# Altium PCB PCB_sheet.PcbDoc
Units mm, origin at the board's own origin, x right, y up, seen from the top; angles counter-clockwise.
Board outline 87.12 x 86.74 mm, 2 copper layers (Top Layer, Bottom Layer); 7 components, 18 nets, 106 pads, 29 vias.
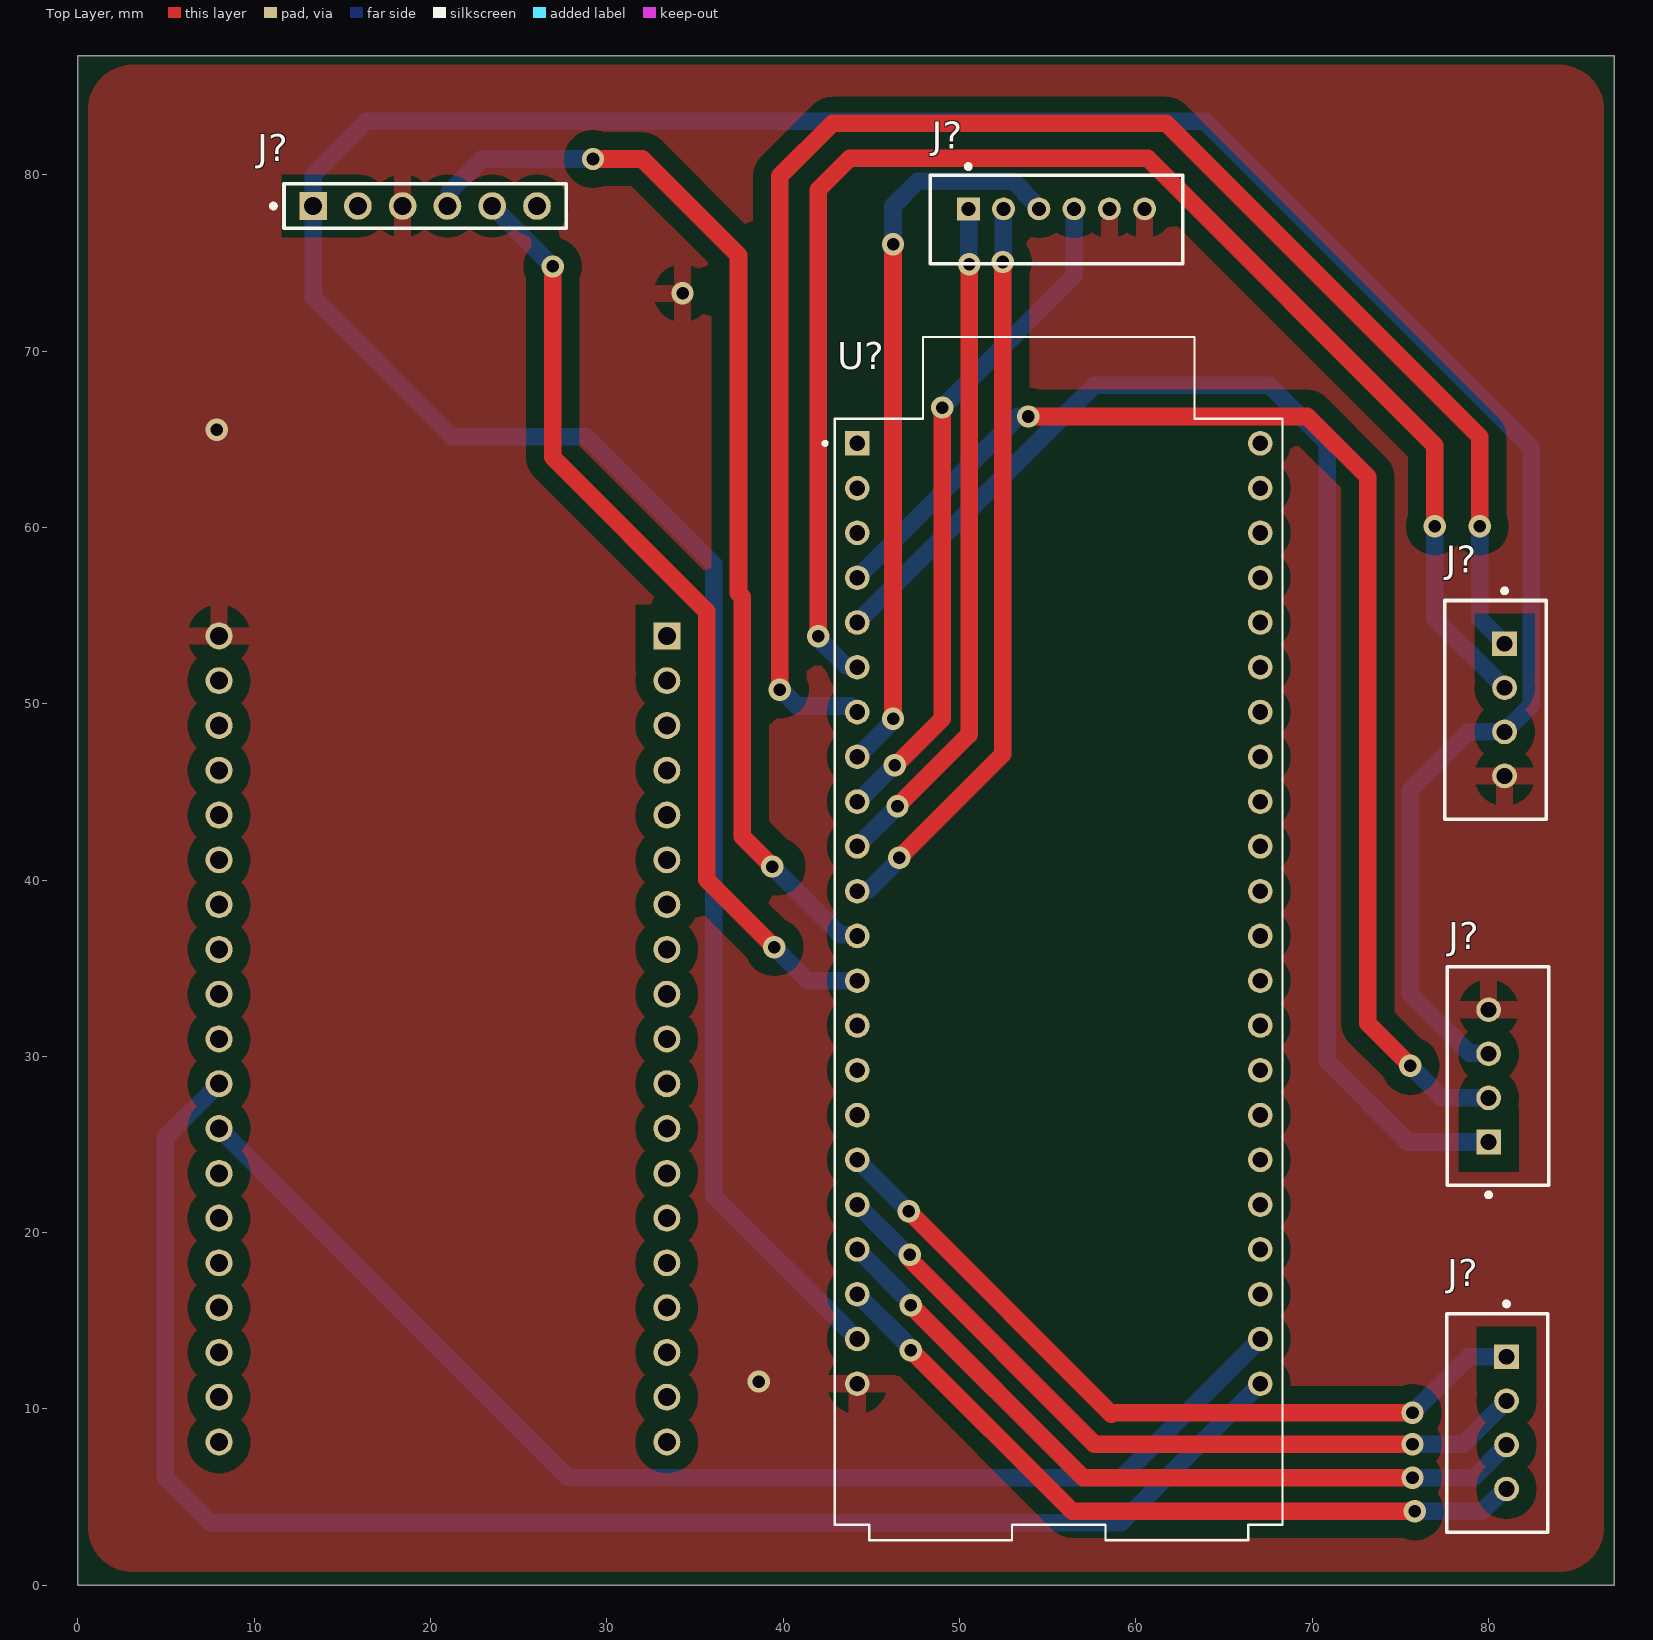
[diagram p0: Top Layer view]
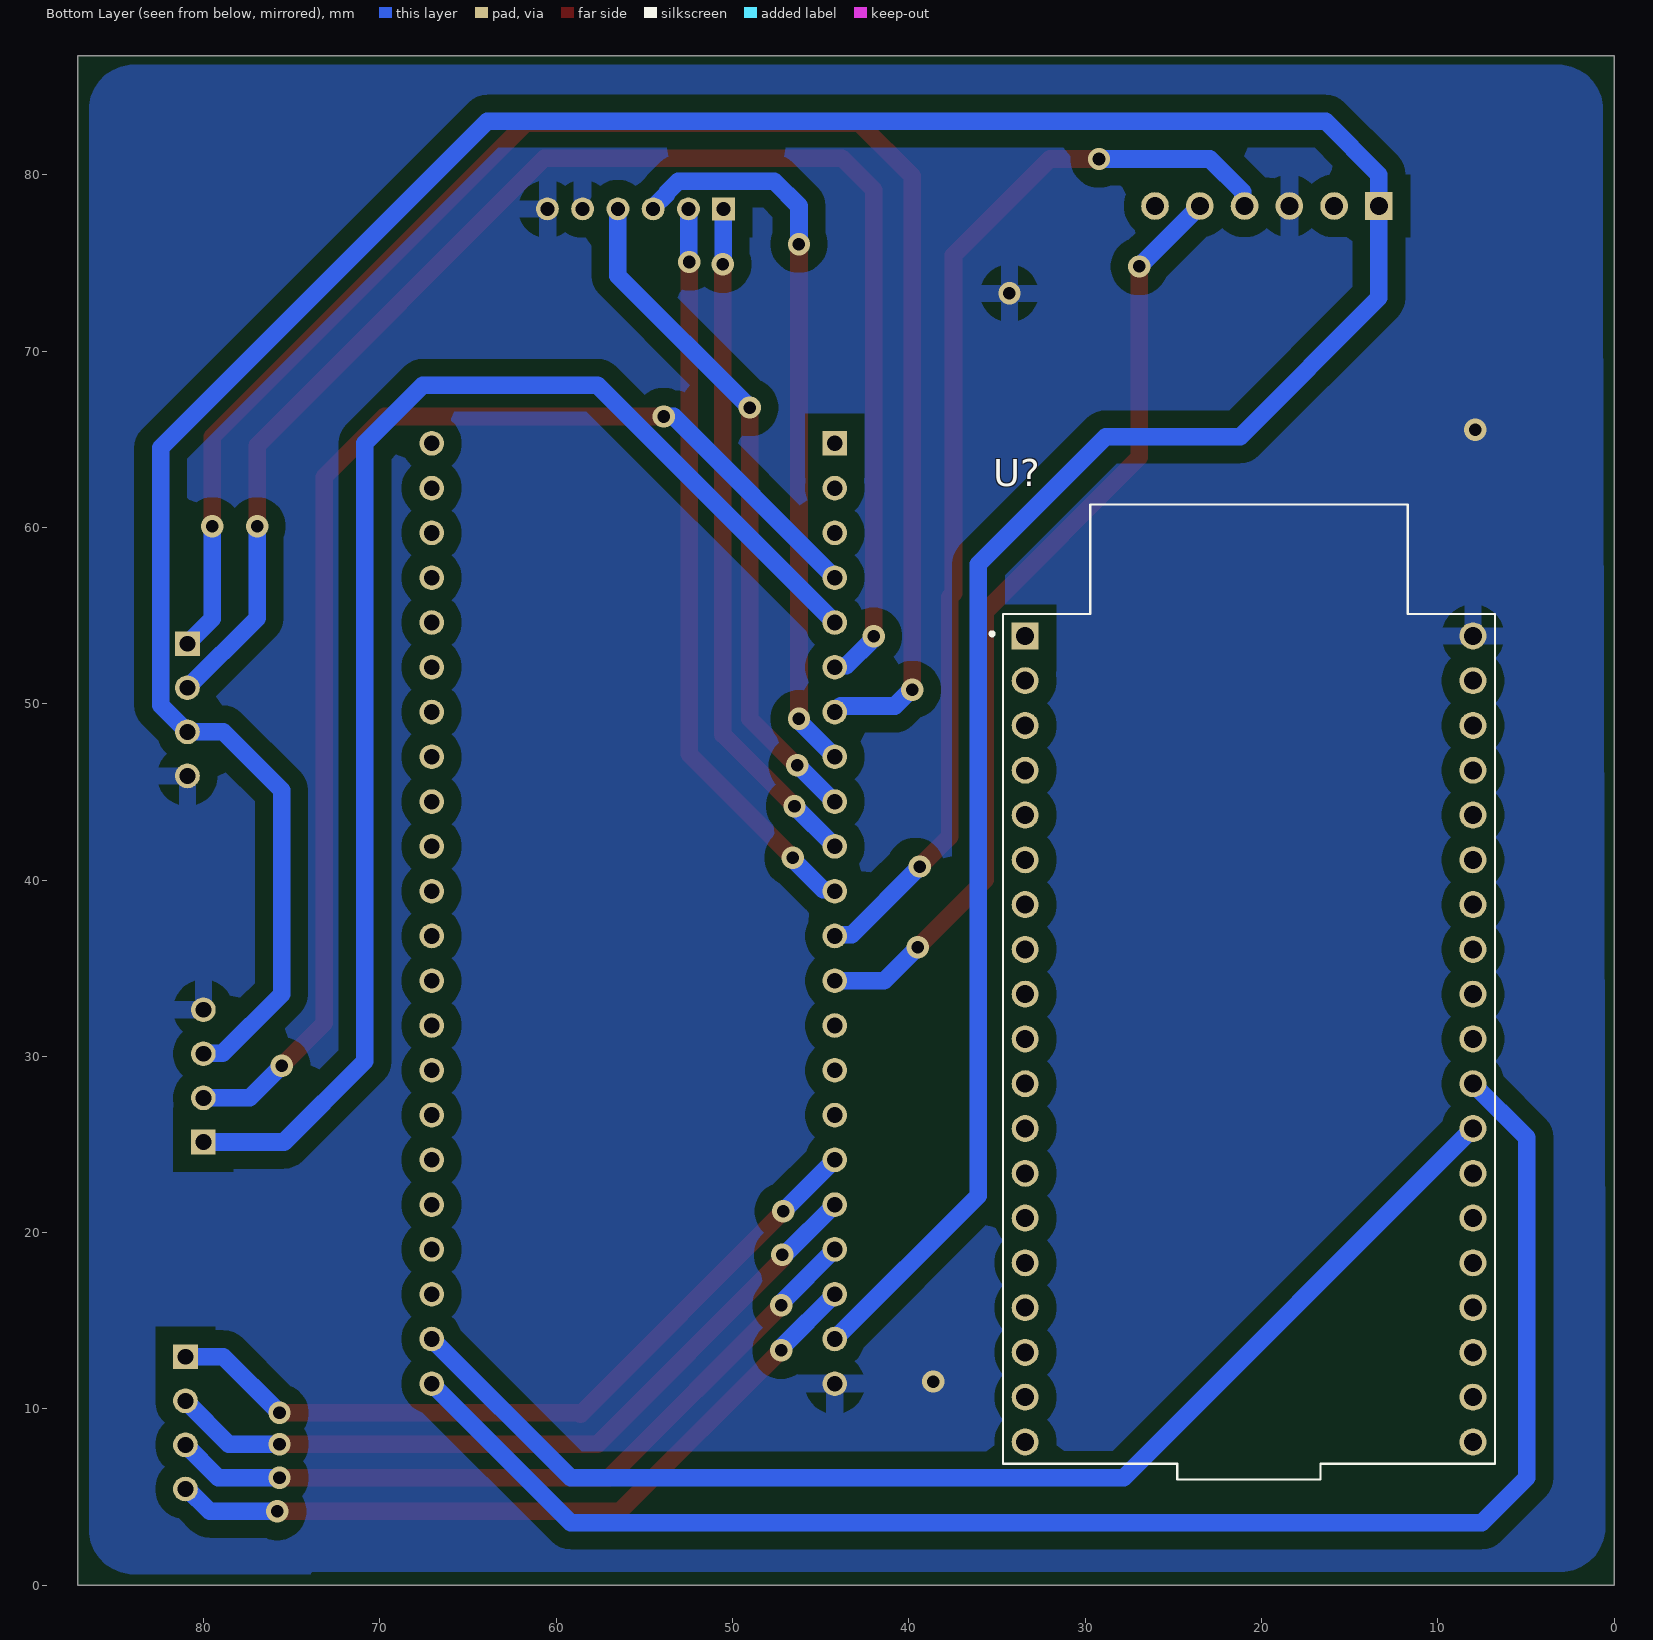
[diagram p1: Bottom Layer view, seen from below]
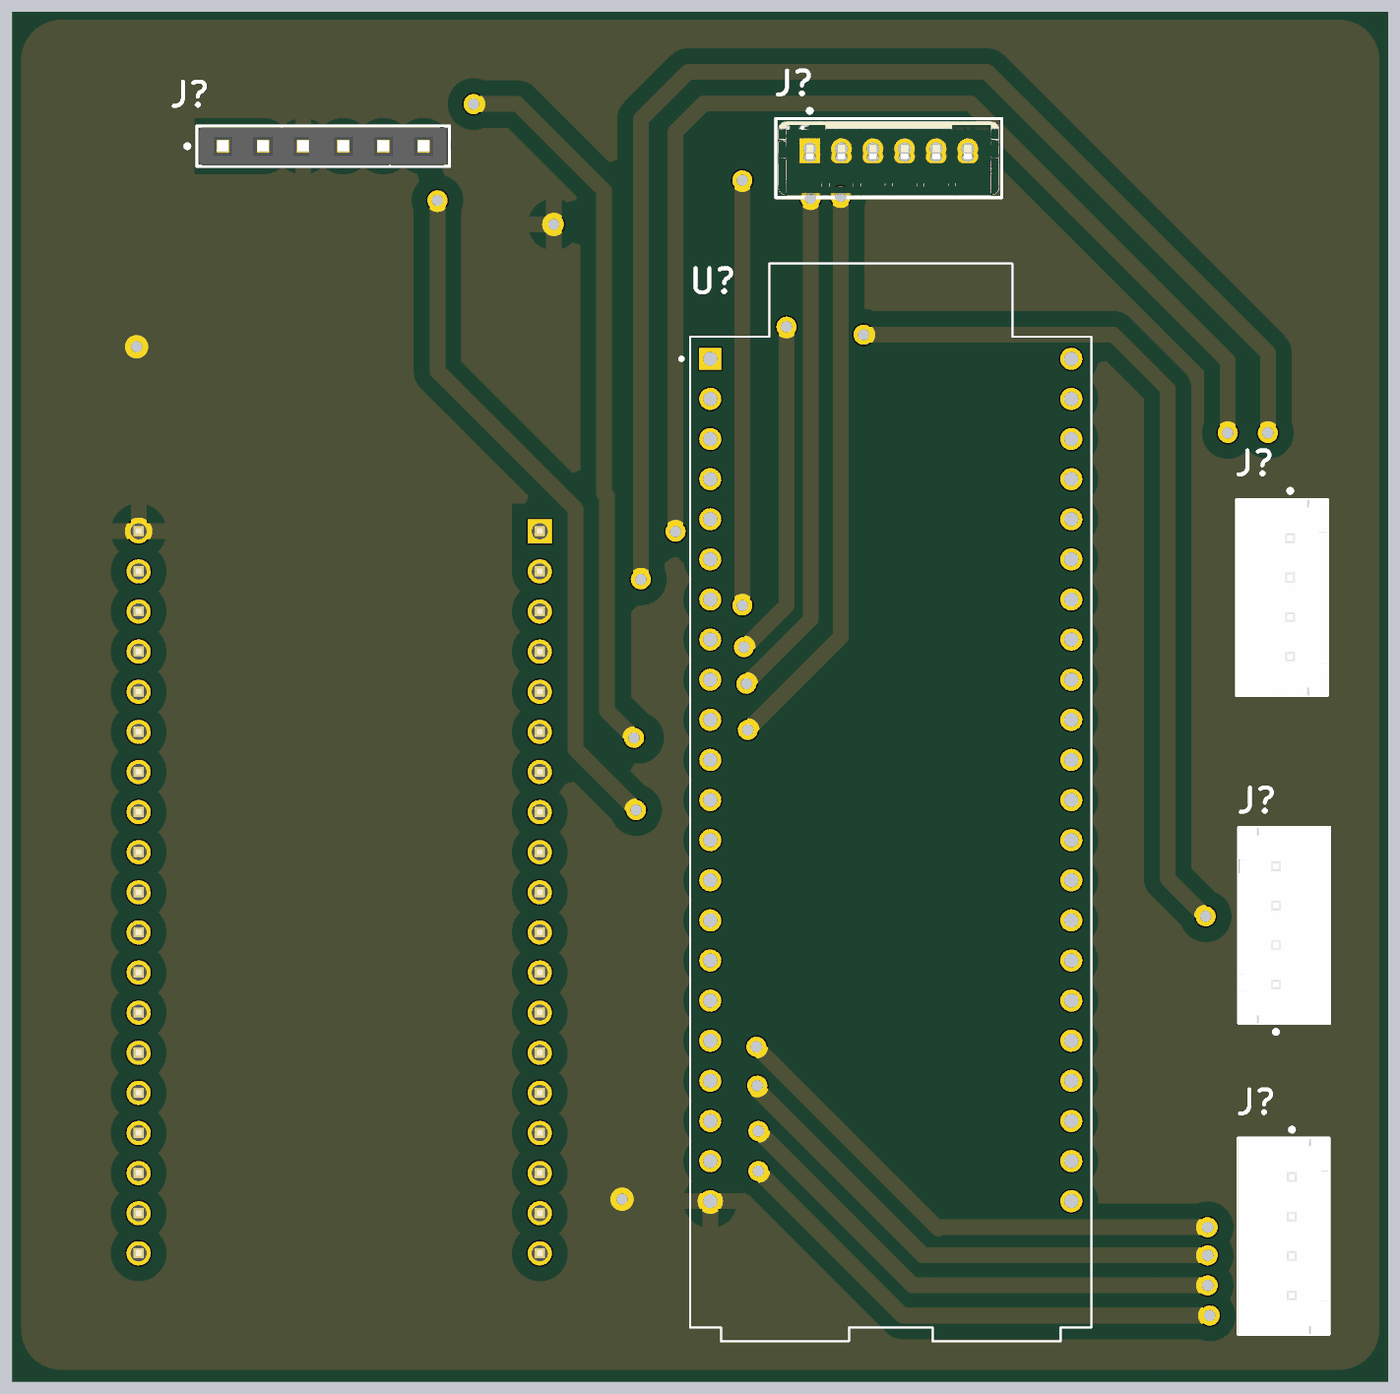
[diagram p2: 3D render of the assembled board from above, using the file's embedded part models]

## Layer stack, top to bottom
Top Solder: solder mask 0.0102, Solder Resist, Dk 3.5
Top Layer: signal copper 0.0356
Dielectric 1: dielectric 0.32, FR-4, Dk 4.8
Bottom Layer: signal copper 0.0356
Bottom Solder: solder mask 0.0102, Solder Resist, Dk 3.5

## Board outline
0,0.381 0,86.741 87.122,86.741 87.122,0 0,0

## Design rules (kind name [scope] priority, off if disabled: settings)
Clearance [All] p1: gap=1 ignorepadtopadclearanceinfootprint=FALSE
PlaneClearance [All] p1: clearance=1
PlaneConnect [All] p1: planeconnectstyle=Relief reliefexpansion=1 reliefentries=4 reliefconductorwidth=1 reliefairgap=1
PolygonConnect [All] p1: connectstyle=Relief reliefconductorwidth=1 reliefentries=4 polygonreliefangle="90 Angle" airgapwidth=1
RoutingVias [All] p1: holewidth=0.711 width=1.27 viastyle="Through Hole" minholewidth=0.711 minwidth=1.27 maxholewidth=0.711 maxwidth=1.27
SolderMaskExpansion [All] p1: expansion=0.102 istentingtop=FALSE
SupplyNets "Schematic Supply Nets_1" [InNet('GND')] p1: voltage=0.000
SupplyNets "Schematic Supply Nets" [InNet('VCC')] p2: voltage=0.000
Width [All] p1: maxlimit=1.5 minlimit=0.5 preferedwidth=1
28 further rules are at their usual default settings.

## Classes and differential pairs
component class Schematic_sheet: J? U?

## Components (designator, comment, footprint, x,y, rotation, side; value= is the part's Value field where it differs from the comment)
J? "SSQ-106-23-F-S" FP-SSQ-106-23-F-S-MFG 19.685,78.232 r0 top
J? "B4B-XH-A(LF)(SN)" FP-B4B-XH-A_LF_SN-MFG 80.501,9.211 r90 top
J? "B4B-XH-A(LF)(SN)" FP-B4B-XH-A_LF_SN-MFG 80.391,49.657 r90 top
J? "B4B-XH-A(LF)(SN)" FP-B4B-XH-A_LF_SN-MFG 80.535,28.896 r270 top
J? "440054-6" FP-440054-6-MFG 55.499,77.47 r180 top
U? "ESP32-S3-DEVKITM-1-N8" MODULE_ESP32-S3-DEVKITM-1-N8 55.626,34.8 r0 top
U? "ESP32-DEVKITC" MODULE_ESP32-DEVKITC 20.701,30.998 r180 bottom

## Footprints (in the part's own frame and the unit in brackets; to place one, negate y for a bottom-side part, rotate by r counter-clockwise, add the part's x,y. Pads: shape width x height; smd on the part's side, far side on the other; paste and mask are expansions set on the pad)
FP-440054-6-MFG [mm]
  rect 1.3x1.3 hole 0.8 paste-2539.97 mask+0: 1(5,-0.6)
  round 1.3 hole 0.8 paste-2539.97 mask+0: 2(3,-0.6) 3(1,-0.6) 4(-1,-0.6) 5(-3,-0.6) 6(-5,-0.6)
  silkscreen extent -7.15,-3.12 7.15,2.5, body extent -7.25,-2.6 7.25,2.6, height 0.25
FP-B4B-XH-A_LF_SN-MFG [mm]
  rect 1.4x1.4 hole 0.9 paste-2539.97 mask+0: 1(3.75,-0.525)
  round 1.4 hole 0.9 paste-2539.97 mask+0: 2(1.25,-0.525) 3(-1.25,-0.525) 4(-3.75,-0.525)
  silkscreen extent -6.2,-2.88 6.87,2.87, body extent -6.3,-2.98 6.3,2.98, height 0.25
FP-SSQ-106-23-F-S-MFG [mm]
  rect 1.57x1.57 hole 1.02 paste-2539.97 mask+0: 1(-6.35,0)
  round 1.57 hole 1.02 paste-2539.97 mask+0: 2(-3.81,0) 3(-1.27,0) 4(1.27,0) 5(3.81,0) 6(6.35,0)
  silkscreen extent -8.72,-1.27 8,1.27, body extent -8.1,-1.37 8.1,1.37, height 0.25
MODULE_ESP32-DEVKITC [mm]
  rect 1.53x1.53 / inner round 1.53 / far side rect 1.53x1.53 hole 1.02: 1(-12.7,22.85)
  round 1.53 hole 1.02: 2(-12.7,20.31) 3(-12.7,17.77) 4(-12.7,15.23) 5(-12.7,12.69) 6(-12.7,10.15) 7(-12.7,7.61) 8(-12.7,5.07) 9(-12.7,2.53) 10(-12.7,-0.01) 11(-12.7,-2.55) 12(-12.7,-5.09) 13(-12.7,-7.63) 14(-12.7,-10.17) 15(-12.7,-12.71) 16(-12.7,-15.25) 17(-12.7,-17.79) 18(-12.7,-20.33) 19(-12.7,-22.87) 20(12.7,-22.87) 21(12.7,-20.33) 22(12.7,-17.79) 23(12.7,-15.25) 24(12.7,-12.71) 25(12.7,-10.17) 26(12.7,-7.63) 27(12.7,-5.09) 28(12.7,-2.55) 29(12.7,-0.01) 30(12.7,2.53) 31(12.7,5.07) 32(12.7,7.61) 33(12.7,10.15) 34(12.7,12.69) 35(12.7,15.23) 36(12.7,17.77) 37(12.7,20.31) 38(12.7,22.85)
  silkscreen extent -14.67,-25 13.95,30.3, body extent -13.97,-24.8 13.97,30.3, height 6.69
MODULE_ESP32-S3-DEVKITM-1-N8 [mil]
  rect 55x55 / inner round 55 / far side rect 55x55 hole 35: J1_1(-450,1179.92)
  round 55 hole 35: J1_2(-450,1079.92) J1_3(-450,979.92) J1_4(-450,879.92) J1_5(-450,779.92) J1_6(-450,679.92) J1_7(-450,579.92) J1_8(-450,479.92) J1_9(-450,379.92) J1_10(-450,279.92) J1_11(-450,179.92) J1_12(-450,79.92) J1_13(-450,-20.08) J1_14(-450,-120.08) J1_15(-450,-220.08) J1_16(-450,-320.08) J1_17(-450,-420.08) J1_18(-450,-520.08) J1_19(-450,-620.08) J1_20(-450,-720.08) J1_21(-450,-820.08) J1_22(-450,-920.08) J3_1(450,1179.92) J3_2(450,1079.92) J3_3(450,979.92) J3_4(450,879.92) J3_5(450,779.92) J3_6(450,679.92) J3_7(450,579.92) J3_8(450,479.92) J3_9(450,379.92) J3_10(450,279.92) J3_11(450,179.92) J3_12(450,79.92) J3_13(450,-20.08) J3_14(450,-120.08) J3_15(450,-220.08) J3_16(450,-320.08) J3_17(450,-420.08) J3_18(450,-520.08) J3_19(450,-620.08) J3_20(450,-720.08) J3_21(450,-820.08) J3_22(450,-920.08)
  silkscreen extent -526,-1269 500,1417

## Part data
J?: library part CMP-02766-000556-1, "CONN RCPT 6POS 0.1 GOLD PCB", Contact Material=Bronze, Contact Plating=Gold, Gender=Receptacle, Lead Free="Lead Free", Mount="Through Hole", Number of Contacts=6, Number of Rows=1, Packaging=Bulk, Pitch=2.54mm, Radiation Hardening=No, REACH SVHC="No SVHC", Termination=Solder
J? J? J?: library part CMP-17439-000250-1, "CONN HEADER VERT 4POS 2.5MM", Color=Natural, Contact Resistance=20mR, Current Rating=3A, Flammability Rating="UL94 V-0", Housing Color=White, Insulation Resistance=1GR, Max Operating Temperature=85°C, Max Voltage Rating (AC)=250V, Min Operating Temperature=-25°C, Package Quantity=500, Connector Type=Header, Contact Finish - Mating=TIN, Contact Material=Brass, Contact Plating=Tin, Contact Shape=Square, Contact Type="Male Pin", Depth=5.75mm, Fastening Type=Detent, Gender=Male, Housing Material=Polyamide, Insulation Color=Natural, Insulation Material=Nylon, Lead Free="Lead Free", Lead Pitch=2.5mm, Length=12.4mm, Mated Stacking Heights=9.8mm, Material=Polyamide, Max Current Rating=3A, Max Voltage Rating (DC)=250V, Mount="Through Hole", Number of Contacts=4, Number of Positions=4, Number of Rows=1, Orientation=Straight, Packaging=Bulk, Pitch=2.5mm, REACH SVHC="No SVHC", Series=XH, Termination=Solder, Voltage Rating=250V, Voltage Rating (AC)=250V, Wire/Cable Gauge=22AWG
J?: library part CMP-03369-000041-1, "CONN HEADER VERT 6POS 2MM", Current Rating=3A, Manufacturer="TE Connectivity", Temperature="-25°C to +85°C", Temperature Range High=+85°C, Temperature Range Low=-25°C, Voltage Rating=250V, Automotive=No, Category=Conn, ComponentLink2Description=Datasheet, ComponentLink2URL=https://www.te.com/usa-en/product-440054-6.datasheet.pdf, Conn Gender=Male, Conn Orientation=Vertical, Contact Material=Tin,Nickel, Device Class L1=Connectors, Device Class L2="Headers and Wire Housings", Device Class L3=unset, Digikey Description="CONN HEADER VERT 6POS 2MM", Footprint Url=https://www.te.com/commerce/DocumentDelivery/DDEController?Action=showdoc&DocId=Customer+Drawing%7F440054%7FF6%7Fpdf%7FEnglish%7FENG_CD_440054_F6.pdf%7F440054-6, Height=6.35mm, Lead Free=Yes, Manufacturer Part Number=440054-6, Mouser Description="Headers & Wire Housings 6 POS HDR VERT 2.0mm", Number of Contacts=6, Number of Rows=1, Octopart=https://octopart.com/440054-6-te+connectivity-40327311, Package=440054-6, Pitch=2mm, RoHS=TRUE
U?: Package=None, Availability=Unavailable, MF="{'manufacturer': u'Espressif Systems'}", MP=ESP32-S3-DEVKITM-1-N8, Price=None
U?: "ESP32-WROOM-32UE series Transceiver; 802.11 b/g/n (Wi-Fi, WiFi, WLAN), Bluetooth Â® Smart Ready 4.x Dual Mode Evaluation Board", Package=None, Check_prices=https://www.snapeda.com/parts/ESP32-DEVKITC/Espressif+Systems/view-part/?ref=eda, MF="Espressif Systems", MP=ESP32-DEVKITC, SnapEDA_Link=https://www.snapeda.com/parts/ESP32-DEVKITC/Espressif+Systems/view-part/?ref=snap

## Via types
v1: diameter 1.27, hole 0.711, Top Layer to Bottom Layer, 29 vias

## Nets (pads, with @x,y where several pads share a name; then routed paths per layer and width w, separated by ;. In a path a pad name is that pad's centre, name@x,y a point inside that pad or via, vN(x,y) a via of type N, cw(c..) or ccw(c..) an arc to the next point about the centre after c; other vN are vias at no path point)
15: J?.1@81.026,12.961 U?.J1_17 | length 44.2
  Top Layer w1: v1(47.117,21.209) 58.623,9.703 58.699,9.779 v1(75.692,9.779)
  Bottom Layer w1: U?.J1_17 v1(47.117,21.209) ; v1(75.692,9.779) 78.874,12.961 J?.1@81.026,12.961
16: J?.2@81.026,10.461 U?.J1_18 | length 43.6
  Top Layer w1: v1(47.169,18.744) 47.169,18.49 57.658,8.001 v1(75.692,8.001)
  Bottom Layer w1: U?.J1_18 46.99,18.796 47.117,18.796 v1(47.169,18.744) ; v1(75.692,8.001) 78.566,8.001 J?.2@81.026,10.461
17: J?.3@81.026,7.961 U?.J1_19 | length 43.1
  Top Layer w1: v1@47.192,15.927 57.023,6.096 v1(75.692,6.096)
  Bottom Layer w1: U?.J1_19 47.192,16.054 47.192,15.927 v1(47.244,15.875) ; v1(75.692,6.096) 79.161,6.096 J?.3@81.026,7.961
18: J?.4@81.026,5.461 U?.J1_20 | length 42.6
  Top Layer w1: v1@47.192,13.387 56.388,4.191 v1(75.819,4.191)
  Bottom Layer w1: U?.J1_20 47.192,13.514 47.192,13.387 v1(47.244,13.335) ; v1(75.819,4.191) 79.648,4.191 80.918,5.461 J?.4@81.026,5.461
GND: J?.3@18.415,78.232 J?.4@80.01,32.646 J?.4@80.916,45.907 J?.5@58.499,78.07 J?.6@60.499,78.07 U?.38 U?.J1_22
  other v1: 38.608,11.557 7.874,65.532 34.29,73.279
Left_dir: J?.3@54.499,78.07 U?.J1_8 | length 41.7
  Top Layer w1: v1(46.228,49.149) v1@46.228,76.146
  Bottom Layer w1: U?.J1_8 46.176,48.97 46.176,49.097 v1(46.228,49.149) ; v1(46.228,76.073) 46.228,78.232 47.625,79.629 53.086,79.629 53.734,78.981 53.734,78.916 54.499,78.151 J?.3@54.499,78.07
Left_pwm: J?.4@56.499,78.07 U?.J1_9 | length 38.8
  Top Layer w1: v1(46.325,46.512) 46.385,46.512 49.022,49.149 v1(49.022,66.802)
  Bottom Layer w1: U?.J1_9 44.23,44.45 46.291,46.512 v1(46.325,46.512) ; v1(49.022,66.802) 56.499,74.279 J?.4@56.499,78.07
LeftA: J?.2@80.916,50.907 U?.J1_6 | length 86.2
  Top Layer w1: v1(41.997,53.828) 41.997,79.158 43.771,80.931 60.679,80.931 76.962,64.648 v1(76.962,60.071)
  Bottom Layer w1: v1(41.997,53.828) 42.049,53.776 42.049,53.648 43.551,52.146 44.12,52.146 U?.J1_6 ; v1(76.962,60.071) 76.962,54.861 J?.2@80.916,50.907
LeftB: J?.1@80.916,53.407 U?.J1_7 | length 94.7
  Top Layer w1: v1(39.801,50.8) 39.801,79.933 42.799,82.931 61.722,82.931 79.502,65.151 v1(79.502,60.071)
  Bottom Layer w1: v1(39.801,50.8) 39.874,50.8 40.803,49.871 43.855,49.871 U?.J1_7 ; v1(79.502,60.071) 79.502,54.821 J?.1@80.916,53.407
Right_dir: J?.1@50.499,78.07 U?.J1_10 | length 38.7
  Top Layer w1: v1@46.534,44.248 50.546,48.26 v1(50.546,74.93)
  Bottom Layer w1: U?.J1_10 v1(46.482,44.196) ; J?.1@50.499,78.07 50.523,78.047 50.523,74.953 v1(50.546,74.93)
Right_pwm: J?.2@52.499,78.07 U?.J1_11 | length 42.5
  Top Layer w1: v1(46.574,41.269) 52.451,47.146 v1(52.451,75.057)
  Bottom Layer w1: U?.J1_11 44.272,39.446 44.841,39.446 46.523,41.127 46.523,41.217 v1(46.574,41.269) ; v1(52.451,75.057) 52.475,75.081 52.475,78.046 J?.2@52.499,78.07
RightA: J?.2@80.01,27.646 U?.J1_4 | length 73.8
  Top Layer w1: v1(53.899,66.294) 69.723,66.294 73.152,62.865 73.152,31.877 v1(75.565,29.464)
  Bottom Layer w1: U?.J1_4 53.34,66.294 v1(53.899,66.294) ; v1(75.565,29.464) 77.383,27.646 J?.2@80.01,27.646
RightB: J?.1@80.01,25.146 U?.J1_5 | length 79.7
  Bottom Layer w1: U?.J1_5 57.658,68.072 67.564,68.072 70.866,64.77 70.866,29.718 75.438,25.146 J?.1@80.01,25.146
SCL: J?.5@23.495,78.232 U?.J1_13 | length 54.2
  Top Layer w1: v1(26.924,74.803) 26.924,63.976 35.666,55.234 35.666,40.026 v1(39.497,36.195)
  Bottom Layer w1: J?.5@23.495,78.232 v1(26.924,74.803) ; v1(39.497,36.195) 41.402,34.29 U?.J1_13
SDA: J?.4@20.955,78.232 U?.J1_12 | length 62.2
  Top Layer w1: v1(29.21,80.899) 32.004,80.899 37.465,75.438 37.465,56.264 37.666,56.063 37.666,42.471 v1(39.37,40.767)
  Bottom Layer w1: J?.4@20.955,78.232 21.064,78.341 21.064,79.033 22.931,80.899 v1(29.21,80.899) ; v1(39.37,40.767) 43.231,36.906 44.12,36.906 U?.J1_12
UART1: U?.28 U?.J3_22 | length 90
  Bottom Layer w1: U?.28 4.953,25.4 4.953,6.096 7.493,3.556 59.182,3.556 U?.J3_22
UART2: U?.27 U?.J3_21 | length 70.5
  Bottom Layer w1: U?.27 27.813,6.096 59.182,6.096 U?.J3_21
VCC: J?.1@13.335,78.232 J?.3@80.01,30.146 J?.3@80.916,48.407 U?.J1_21 | length 202.2
  Bottom Layer w1: U?.J1_21 36.068,22.098 36.068,57.912 28.829,65.151 21.209,65.151 13.335,73.025 13.335,78.232 13.335,80.01 16.359,83.034 63.905,83.034 82.423,64.516 82.423,49.914 80.916,48.407 78.887,48.407 75.565,45.085 75.565,33.528 78.923,30.17 79.986,30.17 J?.3@80.01,30.146
pads on no net: J?.2@15.875,78.232 J?.6@26.035,78.232 U?.1 U?.2 U?.3 U?.4 U?.5 U?.6 U?.7 U?.8 U?.9 U?.10 U?.11 U?.12 U?.13 U?.14 U?.15 U?.16 U?.17 U?.18 U?.19 U?.20 U?.21 U?.22 U?.23 U?.24 U?.25 U?.26 U?.29 U?.30 U?.31 U?.32 U?.33 U?.34 U?.35 U?.36 U?.37 U?.J1_1 U?.J1_2 U?.J1_3 U?.J1_14 U?.J1_15 U?.J1_16 U?.J3_1 U?.J3_2 U?.J3_3 U?.J3_4 U?.J3_5 U?.J3_6 U?.J3_7 U?.J3_8 U?.J3_9 U?.J3_10 U?.J3_11 U?.J3_12 U?.J3_13 U?.J3_14 U?.J3_15 U?.J3_16 U?.J3_17 U?.J3_18 U?.J3_19 U?.J3_20

## Polygon pours and split planes (outlines as drawn)
GND on Top Layer "GND_L01_P001" (solid, remove dead copper, pour order 1): 0.572,83.693 cw(c3.112,83.693) 3.112,86.233 84.011,86.233 cw(c84.011,83.693) 86.551,83.693 86.551,3.302 cw(c84.011,3.302) 84.011,0.762 3.112,0.762 cw(c3.112,3.302) 0.572,3.302 0.572,9.144
GND on Bottom Layer "GND_L02_P002" (solid, remove dead copper, pour order 2): 0.635,75.438 0.635,83.693 cw(c3.175,83.693) 3.175,86.233 83.947,86.233 cw(c83.947,83.693) 86.487,83.693 86.487,3.175 cw(c83.947,3.175) 83.947,0.635 73.914,0.635 ccw(c73.787,0.635) 73.787,0.762 3.048,0.762 cw(c3.048,3.302) 0.508,3.302 0.508,16.764

## Silkscreen, mask and mechanical layers (free items; w line width, h text height)
Mechanical 1:
  lines w0.5: 0,0 87.122,0 87.122,86.487 87.122,86.741 43.561,86.741 4.498,86.741 0,86.741 0,79.883 0,0.635 0,0.381 0,0